# Altium PCB Smart Meter V1.0.PcbDoc (part 1 of 4)
Units mil, origin at the board's own origin, x right, y up, seen from the top; angles counter-clockwise.
Board outline 5111 x 3011 mil, 2 copper layers (Top Layer, Bottom Layer); 181 components, 132 nets, 643 pads, 0 vias.
Unrouted connection lines stored in the file: 416.
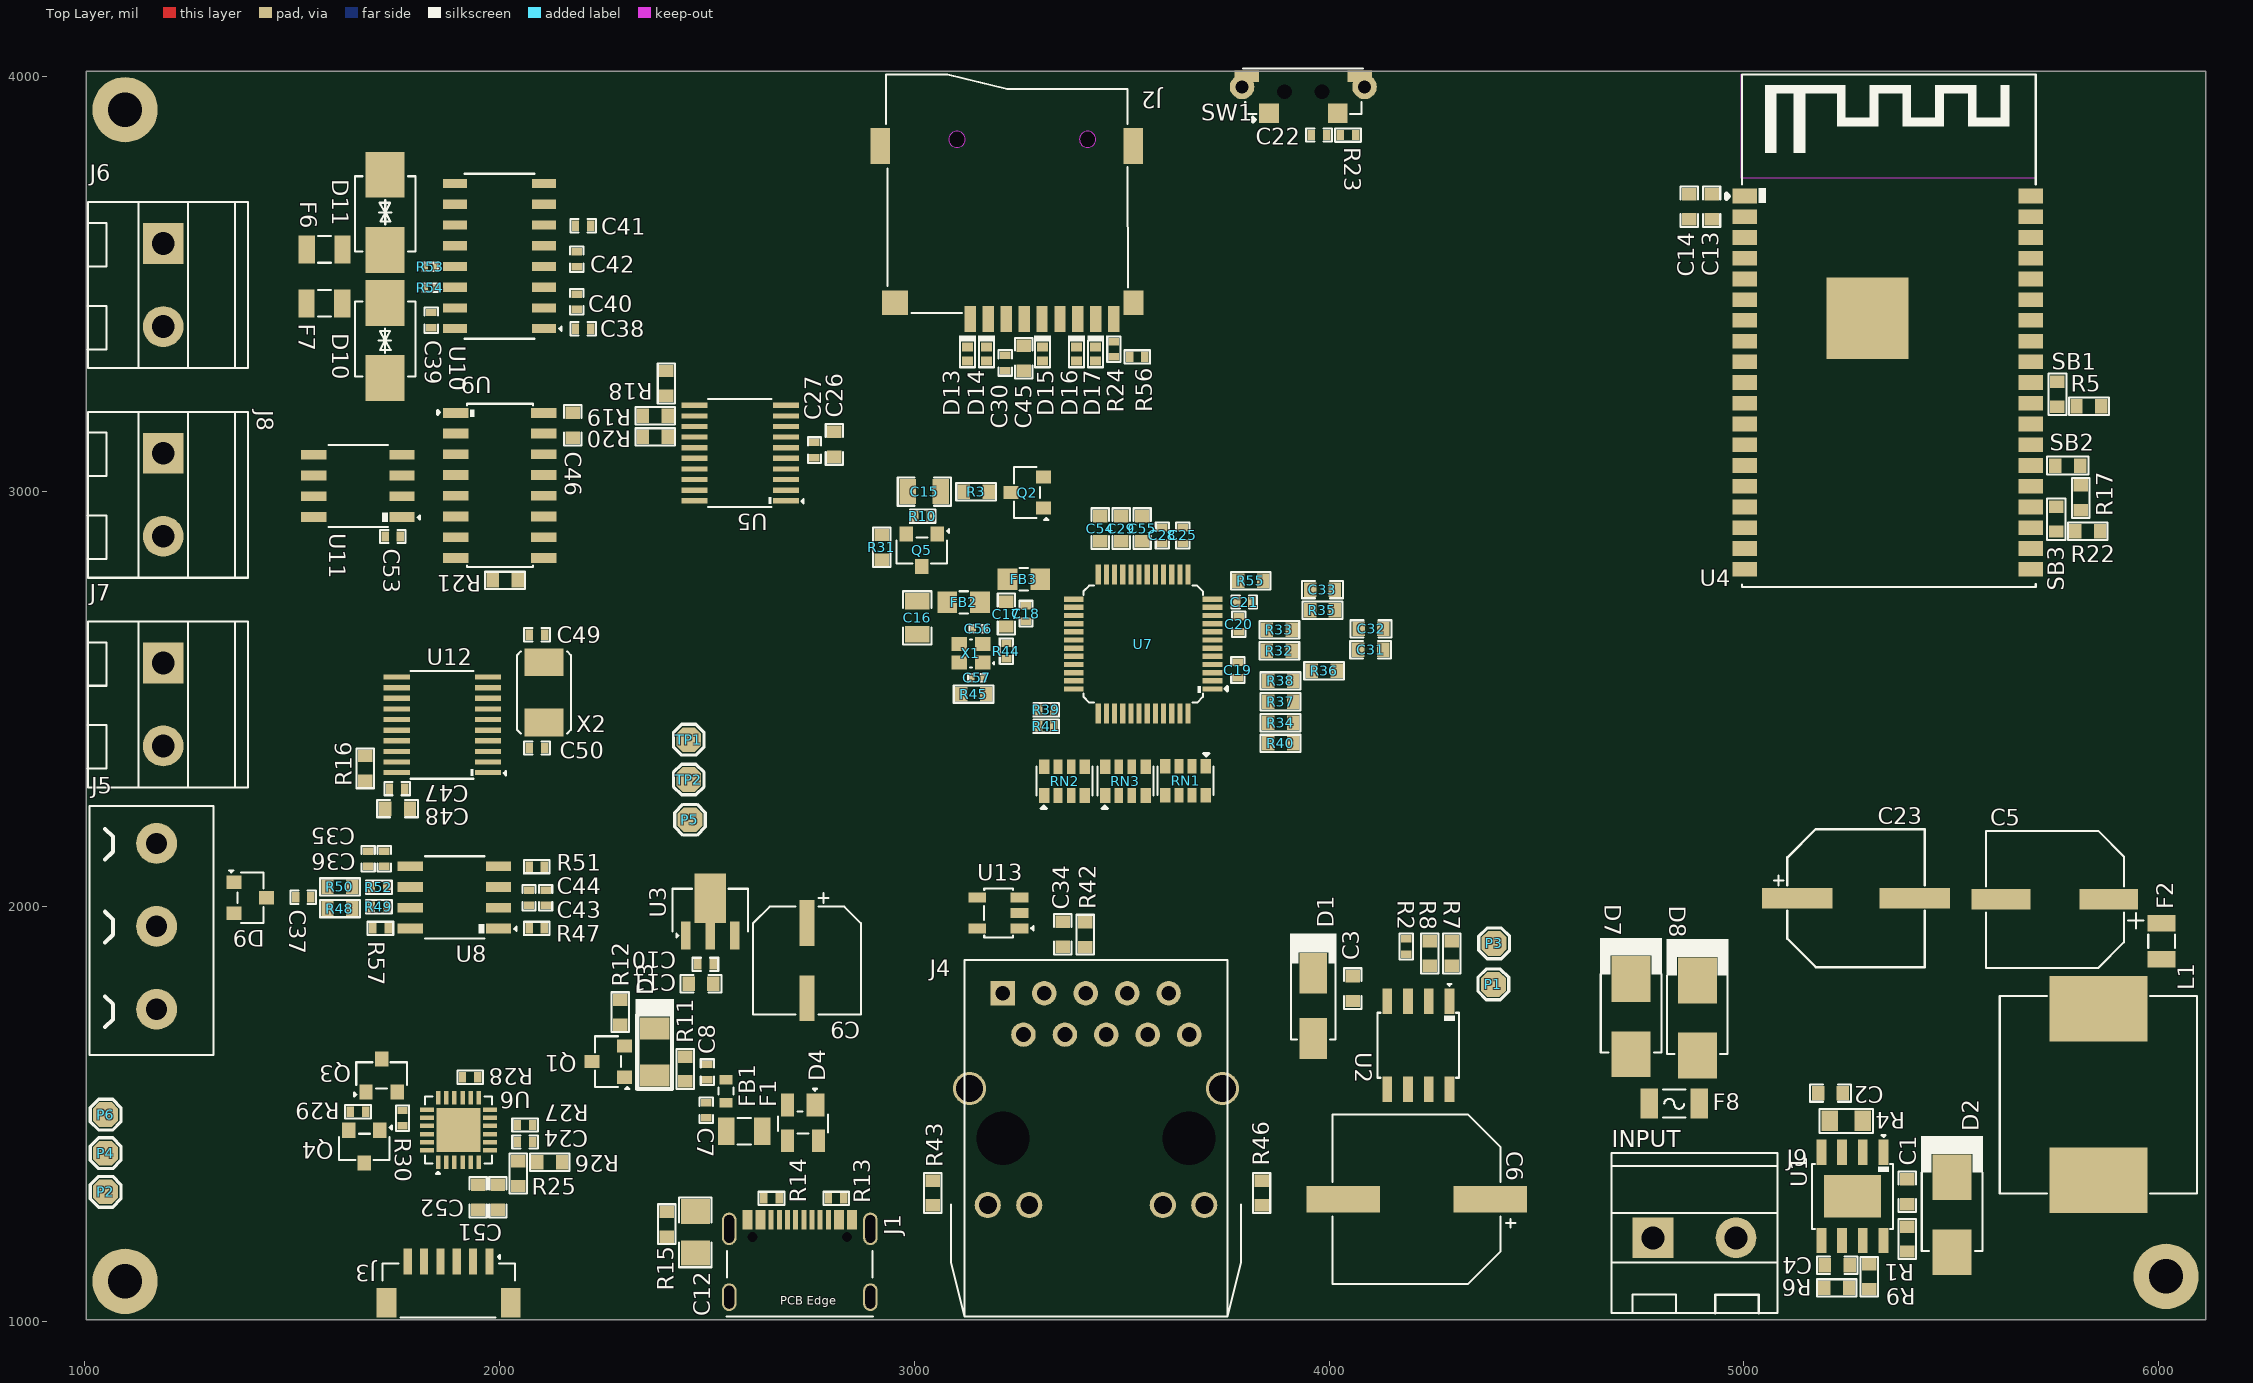
[diagram p0: Top Layer view]
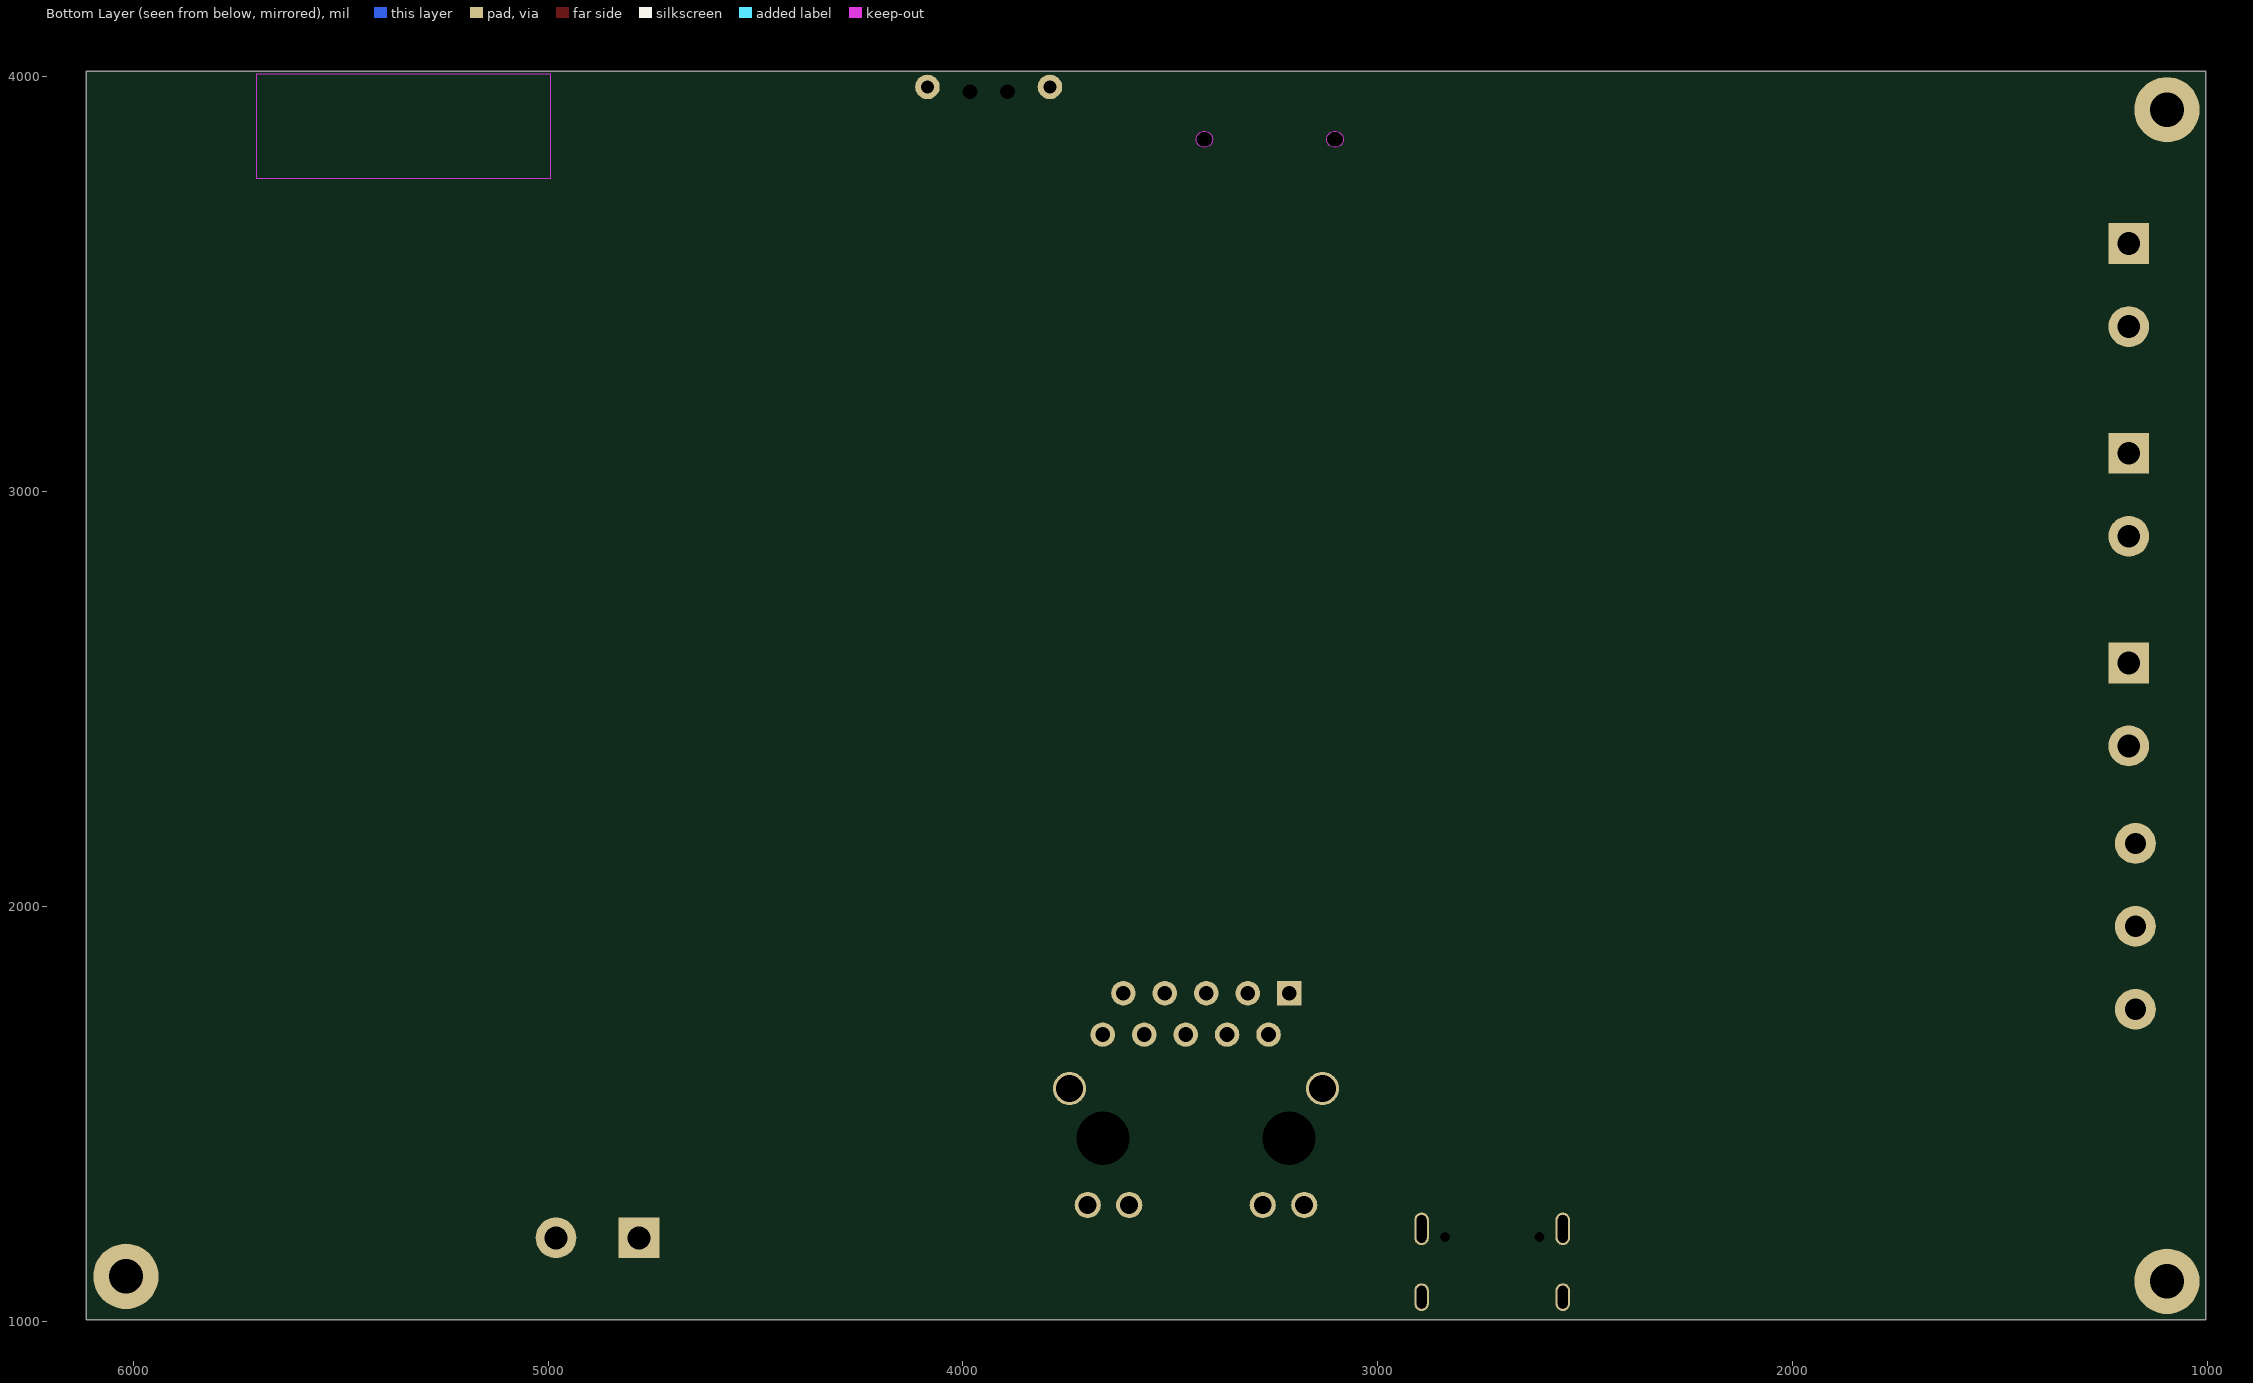
[diagram p1: Bottom Layer view, seen from below]

## Layer stack, top to bottom
Top Solder: solder mask 0.4, Solder Resist, Dk 3.5
Top Layer: signal copper 1.4
Dielectric 1: dielectric 12.6, FR-4, Dk 4.8
Bottom Layer: signal copper 1.4
Bottom Solder: solder mask 0.4, Solder Resist, Dk 3.5

## Board outline
1003,1003 1003,4014 6114,4014 6114,1003

## Design rules (kind name [scope] priority, off if disabled: settings)
Clearance [All] p1: gap=10 ignorepadtopadclearanceinfootprint=FALSE except(0: Arc-Hole Track-Hole SMDPad-Hole THPad-Hole Via-Hole Fill-Hole Poly-Hole Region-Hole Text-Hole)
DiffPairsRouting [All] p1: maxlimit=10 minlimit=10 mostfreqgap=10 toplayer_minwidth=15 toplayer_maxwidth=15 toplayer_prefwidth=15 bottomlayer_minwidth=15 bottomlayer_maxwidth=15 bottomlayer_prefwidth=15 maxuncoupledlength=500
MatchedLengths "Schematic Matched Net Lengths_1" [InNetClass('Ethernet')] p1: tolerance=20 checknetsindiffpair=FALSE checkdiffpairvsdiffpair=TRUE checkxsignals=TRUE checkothers=TRUE
MatchedLengths "Schematic Matched Net Lengths" [InNetClass('USB')] p2: tolerance=50 checknetsindiffpair=TRUE checkdiffpairvsdiffpair=FALSE checkxsignals=FALSE checkothers=FALSE
MatchedLengths "Schematic Matched Net Lengths_2" [InNetClass('USB')] p3: tolerance=20 checknetsindiffpair=TRUE checkdiffpairvsdiffpair=FALSE checkxsignals=FALSE checkothers=FALSE
MaxMinImpedance "Schematic Impedance Constraint_1" [InNetClass('Ethernet')] p1: minimum=97.00 maximum=105.0
MaxMinImpedance "Schematic Impedance Constraint" [InNetClass('USB')] p2: minimum=85.00 maximum=90.00
MaxMinImpedance "Schematic Impedance Constraint_3" [InNetClass('USB')] p3: minimum=87.00 maximum=92.00
MaxMinImpedance "Schematic Impedance Constraint_2" [InNetClass('CAN')] p4: minimum=117.0 maximum=123.0
PolygonConnect [All] p1: connectstyle=Relief reliefconductorwidth=10 reliefentries=4 polygonreliefangle="90 Angle" airgapwidth=10
RoutingVias [All] p1: holewidth=28 width=50 viastyle="Through Hole" minholewidth=28 minwidth=50 maxholewidth=28 maxwidth=50
SolderMaskExpansion [All] p1: expansion=4 istentingtop=FALSE
Width [All] p1: maxlimit=10 minlimit=10 preferedwidth=10
29 further rules are at their usual default settings.

## Classes and differential pairs
differential pair class USB_Lines: USB_D
differential pair class Ethernet_Lines: RD TD
differential pair class CAN: CAN
differential pair class CAN_Lines: CAN
net class USB: USB_D_N USB_D_P
net class Ethernet: RD_N RD_P TD_N TD_P
net class CAN: CAN_N CAN_P
component class "SD Card-Sheet": C30 C45 D13 D14 D15 D16 D17 J2 J10 R24 R55 R56
component class "RS232, RS485 and RS422": C38 C39 C40 C41 C42 C53 D10 D11 F6 F7 R53 R54 U10 U11
component class "Power Sheet1": C1 C2 C3 C4 C5 C6 C7 C8 C9 C10 C11 C12 C23 D1 D2 D3 D4 D7 D8 F1 F2 FB1 J1 L1 P1 P2 P3 P4 P5 P6 Q1 R1 R2 R4 R6 R7 R8 R9 R11 R12 R13 R14 R15 U1 U2 U3
component class "Ethernet Sheet": C15 C16 C17 C18 C19 C20 C21 C25 C28 C29 C31 C32 C33 C34 C54 C55 C56 C57 FB2 FB3 J4 Q2 Q5 R3 R10 R31 R32 R33 R34 R35 R36 R37 R38 R39 R40 R41 R42 R43 R44 R45 R46 R55 RN1 RN2 RN3 U7 U13 X1
component class "Controller Sheet": C13 C14 C22 C24 C26 C27 C46 C51 C52 J3 Q3 Q4 R5 R17 R18 R19 R20 R21 R22 R23 R25 R26 R27 R28 R29 R30 SB1 SB2 SB3 SW1 U4 U5 U6 U9
component class Connector_Sheet: F8 J5 J6 J7 J8 J9
component class Can_Sheet: C35 C36 C37 C43 C44 C47 C48 C49 C50 D9 R16 R47 R48 R49 R50 R51 R52 R57 TP1 TP2 U8 U12 X2
differential pair USB_D: +USB_D_P -USB_D_N
differential pair TD: +TD_P -TD_N
differential pair RD: +RD_P -RD_N
differential pair CAN: +CAN_P -CAN_N

## Components (designator, comment, footprint, x,y, rotation, side; value= is the part's Value field where it differs from the comment)
C1 "0.1uF" Cap-0603 5393.84,1312 r270 top
C2 "0.1uF" Cap-0603 5208.84,1550 r180 top
C3 "0.1uF" Cap-0603 4057,1802 r90 top
C4 "12pF" Cap-0603 5225,1135.16 r0 top
C5 "470uF" VZH471M1CTR-0810 5750,2017 r180 top
C6 "15uF" UD2C150M1010 4210.83,1294 r180 top
C7 "0.1uF" Cap-0402 2498,1508.5 r90 top
C8 "0.1uF" Cap-0402 2501,1600.5 r270 top
C9 "100uF" UCD1A101MCL1GS 2741,1869.45 r270 top
C10 "0.1uF" Cap-0402 2496.13,1860.3 r0 top
C11 "10uF" Cap-0603 2485.63,1813.3 r180 top
C12 "4.7nF" Cap-1206 2472,1214 r270 top
C13 "0.1uF" CAP-0603 4922,3687 r270 top
C14 "22uF" Cap-0603 4868,3687 r270 top
C15 "22uF" Cap-0805 3024,3000 r180 top
C16 "22uF" Cap-0805 3007,2696 r90 top
C17 "10uF" Cap-0603 3222,2705 r90 top
C18 "0.1uF" Cap-0402 3269,2706 r90 top
C19 "0.1uF" Cap-0402 3780,2570 r90 top
C20 "0.1uF" Cap-0402 3782,2680.5 r270 top
C21 "0.1uF" Cap-0402 3795.5,2734 r180 top
C22 "1uF" Cap-0402 3975.5,3860 r0 top
C23 "100uF" VKMD1451K101MV 5128.8,2020 r0 top
C24 "1uF" Cap-0402 2061.5,1432 r0 top
C25 "0.1uF" Cap-0402 3647,2894.5 r270 top
C26 "0.1uF" CAP-0603 2807.3,3114 r90 top
C27 "1uF" Cap-0402 2759.06,3100.2 r90 top
C28 "0.1uF" Cap-0402 3598,2894.5 r270 top
C29 "10uF" Cap-0603 3498.5,2911 r270 top
C30 "0.1uF" Cap-0402 3219,3310.5 r90 top
C31 "6.8nF" Cap-0603 4100,2619 r180 top
C32 "6.8nF" Cap-0603 4101,2669 r180 top
C33 "10nF" Cap-0603 3984,2764 r0 top
C34 "22nF" Cap-0603 3358,1933 r90 top
C35 "4.7uF" Cap-0402 1722,2115 r270 top
C36 "0.1uF" Cap-0402 1683,2115 r270 top
C37 "4.7nF" Cap-0402 1526.5,2022 r180 top
C38 "0.1uf" Cap-0402 2201.5,3393 r0 top
C39 "0.1uf" Cap-0402 1835,3413.5 r270 top
C40 "0.1uf" Cap-0402 2186,3458 r270 top
C41 "0.1uf" Cap-0402 2201.5,3641 r180 top
C42 "0.1uf" Cap-0402 2186,3560.5 r90 top
C43 "0.1uF" Cap-0402 2111,2021 r90 top
C44 "4.7uF" Cap-0402 2071,2021 r90 top
C45 "10uF" Cap-0603 3264,3322 r270 top
C46 "0.1uF" CAP-0603 2176.3,3160 r270 top
C47 "0.1uF" Cap-0402 1753,2284 r0 top
C48 "10uF" Cap-0603 1754,2236 r180 top
C49 "22PF" Cap-0402 2090,2655 r0 top value=22pF
C50 "22PF" Cap-0402 2090,2382 r0 top value=22pF
C51 "4.7uF" Cap-0603 1996,1299 r270 top
C52 "100nF" Cap-0603 1948,1299 r270 top
C53 "0.1uf" Cap-0402 1742.5,2892 r0 top
C54 "10nF" Cap-0603 3448,2911 r270 top
C55 "4.7uF" Cap-0603 3549,2911 r270 top
C56 "12pF" CAP-0201 3154,2669 r0 top
C57 "12pF" CAP-0201 3151,2551 r180 top
D1 "SMAJ58A" SMA 3962,1760 r270 top
D2 "SS510B" SMB_ 5501.84,1256.45 r90 top
D3 "PMEG4030ER" SOD-123FL 2374,1649 r270 top
D4 "SP0503BAHTG" SOT-143-4_ 2761.13,1521.61 r270 top
D7 "SS510B" SMB_ 4728,1734.45 r90 top
D8 "SS510B" SMB_ 4888,1731 r90 top
D9 "CDSOT23-T24CAN-Q" SOT-23 1399,2021 r270 top
D10 "SMBJ26CA" "SMB Bi Directional" 1724,3364.45 r90 top
D11 "SMBJ26CA" "SMB Bi Directional" 1724,3673.45 r270 top
D13 "ESD5451N-2/TR" DFN1006-2L_ 3128,3331.99 r270 top
D14 "ESD5451N-2/TR" DFN1006-2L_ 3174,3332 r270 top
D15 "ESD5451N-2/TR" DFN1006-2L_ 3309,3332 r270 top
D16 "ESD5451N-2/TR" DFN1006-2L_ 3391,3332 r270 top
D17 "ESD5451N-2/TR" DFN1006-2L_ 3437,3332 r270 top
F1 "BSMD0805L-200" Fuse-0805 2590,1458 r180 top
F2 "BSMD0805L-200" Fuse-0805 6007,1916 r90 top
F6 "SMD0805P020TF" Fuse-0805 1578,3584 r0 top
F7 "SMD0805P020TF" Fuse-0805 1577.69,3454 r0 top
F8 "JFC1206-1100FS" "Fuse 1206 (3216 Metric)" 4832,1525 r0 top
FB1 "BLM18SG121TN1D" "IND-0603 (1608 Metric)" 2546,1554.44 r90 top
FB2 "CBM201209U601T" Ind-0805 3119,2733 r0 top
FB3 "CBM201209U601T" Ind-0805 3264,2789 r180 top
J1 "TYPE-C-31-M-12" TYPE-C-31-M-12_ 2723.72,1151.5 r0 top
J2 "TF-01A" TF-01A 3223,3625 r180 top
J3 "Voltlink Target" "Voltlink Target" 1877,1094 r180 top
J4 "HY931147C" HY931147C 3438,1535.5 r0 top
J5 "WJ500V-5.08-3P" WJ500V-5.08-3P 1173,2152 r270 top
J6 "1715721" 1715721 1189,3498 r270 top
J7 "1715721" 1715721 1189,2487 r270 top
J8 "1715721" 1715721 1189,2992.5 r270 top
J9 "1715721" 1715721 4881,1201 r0 top
L1 "33uH" CYH127-33UH 5855,1546.31 r90 top
P1 "TEST POINT" Test-point 4396,1812 r270 top
P2 "TEST POINT" Test-point 1050,1312 r270 top
P3 "TEST POINT" Test-point 4398,1911 r270 top
P4 "TEST POINT" Test-point 1050,1405 r0 top
P5 "TEST POINT" Test-point 2459,2209 r0 top
P6 "TEST POINT" Test-point 1050,1498 r270 top
Q1 "SI2323DS" SOT-23 2262,1626 r90 top
Q2 "LMUN2211LT1G" SOT-23 3272,2998 r90 top
Q3 "SS8050-G" SOT-23 1715.4,1592.37 r0 top
Q4 "SS8050-G" SOT-23 1674,1421 r180 top
Q5 "WPM2015-3/TR" Sot-23 3018,2859 r180 top
R1 "4.7R" Res-0603 5393.84,1198 r270 top
R2 "24.9K" Res-0402 4186,1903.5 r90 top
R3 "1K" Res-0603 3149,3000 r0 top
R4 "30mR" RES-0805 5246.84,1483 r180 top
R5 "10K" Res-0603 5832,3206 r0 top value=10kR
R6 "300K" Res-0603 5224,1080.16 r0 top
R7 "180K" Res-0603 4296,1886.5 r270 top value=180kR
R8 "4.42K" Res-0603 4243,1886.5 r270 top value=4.42kR
R9 "57.6K" Res-0603 5302,1107.16 r270 top
R10 "10K" Res-0402 3020,2941 r0 top
R11 "100K" Res-0603 2448,1608 r270 top
R12 "100K" Res-0603 2291,1745 r270 top
R13 "5.1K" Res-0402 2811.5,1296 r180 top
R14 "5.1K" Res-0402 2655.5,1296 r0 top
R15 "1M" Res-0603 2403,1234 r270 top
R16 "10K" Res-0603 1676,2333 r270 top value=10kR
R17 "4.7K" Res-0603 5812,2985 r90 top
R18 "4.7K" Res-0603 2402.3,3261 r270 top
R19 "4.7K" Res-0603 2375.3,3183 r0 top
R20 "4.7K" Res-0603 2375.3,3132 r0 top
R21 "4.7K" Res-0603 2013.3,2786 r0 top
R22 "4.7K" Res-0603 5829,2905 r180 top
R23 "10K" Res-0402 4045.5,3860 r0 top
R24 "22" Res-0402 3481,3343.5 r270 top
R25 "22.1K" Res-0603 2045,1356 r90 top
R26 "47.5K" Res-0603 2121,1383 r180 top
R27 "1K" Res-0402 2061.5,1473 r180 top
R28 "10K" Res-0402 1929,1588 r180 top
R29 "10K" Res-0402 1658.5,1505 r180 top
R30 "10K" Res-0402 1766,1489.5 r90 top
R31 "DNP" Res-0603 2921,2866 r270 top
R32 "33R" Res-0603 3880,2616.8 r180 top
R33 "33R" Res-0603 3880,2667 r180 top
R34 "33R" Res-0603 3883,2443.2 r180 top
R35 "49.9R" Res-0603 3984,2714 r180 top
R36 "49.9R" Res-0603 3988,2568 r180 top
R37 "33R" Res-0603 3883,2493.4 r180 top
R38 "49.9R" Res-0603 3883,2543.6 r180 top
R39 "10K" Res-0402 3318,2474 r0 top
R40 "49.9R" Res-0603 3883,2393 r180 top
R41 "10K" Res-0402 3318,2435 r0 top
R42 "10R" Res-0603 3412,1932 r90 top
R43 "330R" Res-0603 3044,1309 r90 top
R44 "1M" Res-0402 3222,2615.5 r270 top
R45 "0R" Res-0603 3143,2512 r0 top
R46 "330R" Res-0603 3837,1309 r90 top
R47 "22R" Res-0402 2089.5,1947 r0 top
R48 "60.4R" Res-0603 1615,1995 r180 top
R49 "0R" Res-0402 1709,1999 r180 top
R50 "60.4R" Res-0603 1615,2047 r0 top
R51 "22R" Res-0402 2089.5,2096 r0 top
R52 "0R" Res-0402 1709,2046 r180 top
R53 "22R" Res-0201 1833,3542 r0 top
R54 "22R" Res-0201 1833,3492 r0 top
R55 "12.4K" Res-0603 3811,2785 r180 top
R56 "100K" Res-0402 3537.5,3325 r0 top
R57 "4.7K" Res-0402 1712.5,1947 r0 top
RN1 "10K" YC164-FR-0710KL 3702.64,2337.68 r270 top value=10kR
RN2 "10K" YC164-FR-0710KL 3313.43,2267.32 r90 top value=10kR
RN3 "10K" YC164-FR-0710KL 3459.93,2267.32 r90 top value=10kR
SB1 "Solder Bridge 0603" "Solder Bridge" 5756,3235 r270 top
SB2 "Solder Bridge 0603" "Solder Bridge" 5781,3063 r0 top
SB3 "Solder Bridge 0603" "Solder Bridge" 5753,2934 r270 top
SW1 "YTS-B003-2A" YTS-B003-2A 3937.72,3957.11 r0 top
TP1 "TEST POINT" Test-point 2456,2402 r0 top
TP2 "TEST POINT" Test-point 2456,2306 r90 top
U1 "TX4138" 8-SOIC-EP 5261.84,1301 r270 top
U2 "TPS2375DR" SOIC-8 4215,1665.3 r270 top
U3 "LR1107G-33-AB3-C-R" SOT-89-3 2508.06,1974.59 r0 top
U4 "ESP32-WROVER-E-N8R8" ESP32-WROVER-E-N8R8 5347,3263 r0 top
U5 "PCF8574APWR" TSSOP-20 2580.06,3093.2 r180 top
U6 "CP2102N-A02-GQFN24R" "24-WQFN (4x4)" 1901,1461 r90 top
U7 "W5500" "48-LQFP (7x7)_" 3551.68,2632.53 r180 top
U8 "TCAN1044VDRQ1" "SOIC-8(0.154\", 3.90mm Width)" 1891,2022 r180 top
U9 "TPW4053-SR" SOIC-16 2000.3,3015 r0 top
U10 "MAX3232ESE" SOP-16 1999.73,3568 r180 top
U11 "MAX3490EESA+T" "SOIC-8(0.154\", 3.90mm Width)" 1658.3,3014 r180 top
U12 "MCP2515T-I/ST" TSSOP-20 1862.24,2437.8 r180 top
U13 "SP0504BAHTG" SOT-23-5 3202.82,1984.4 r180 top value=30pF
X1 "25MHz" Q22FA12800090 3165,2587.72 r180 top
X2 "8MHz" SMD5032-2P 2107,2516 r90 top

## Footprints (in the part's own frame and the unit in brackets; to place one, negate y for a bottom-side part, rotate by r counter-clockwise, add the part's x,y. Pads: shape width x height; smd on the part's side, far side on the other; paste and mask are expansions set on the pad)
8-SOIC-EP [mm]
  rect 1.55x0.6 smd: 1(-2.7,1.905) 2(-2.7,0.635) 3(-2.7,-0.635) 4(-2.7,-1.905) 5(2.7,-1.905) 6(2.7,-0.635) 7(2.7,0.635) 8(2.7,1.905)
  rect 2.613x3.502 smd: 9(0,0)
  silkscreen extent -3.76,-2.49 1.99,2.49, body extent -3,-2.45 3,2.45, height 1.7
"24-WQFN (4x4)" [mm]
  rect 0.85x0.28 smd: 1(-1.975,1.25) 2(-1.975,0.75) 3(-1.975,0.25) 4(-1.975,-0.25) 5(-1.975,-0.75) 6(-1.975,-1.25) 13(1.975,-1.25) 14(1.975,-0.75) 15(1.975,-0.25) 16(1.975,0.25) 17(1.975,0.75) 18(1.975,1.25)
  rect 0.28x0.85 smd: 7(-1.25,-1.925) 8(-0.75,-1.925) 9(-0.25,-1.925) 10(0.25,-1.925) 11(0.75,-1.925) 12(1.25,-1.925) 19(1.25,1.925) 20(0.75,1.925) 21(0.25,1.925) 22(-0.25,1.925) 23(-0.75,1.925) 24(-1.25,1.925)
  rect 2.7x2.7 smd: 25(0,0)
  silkscreen extent -2.69,-2.06 2.06,2.06, body extent -2,-2 2,2, height 0.8
"48-LQFP (7x7)_" [mm]
  rect 1.22x0.32 smd: 1(-4.25,2.75) 2(-4.25,2.25) 3(-4.25,1.75) 4(-4.25,1.25) 5(-4.25,0.75) 6(-4.25,0.25) 7(-4.25,-0.25) 8(-4.25,-0.75) 9(-4.25,-1.25) 10(-4.25,-1.75) 11(-4.25,-2.25) 12(-4.25,-2.75) 25(4.25,-2.75) 26(4.25,-2.25) 27(4.25,-1.75) 28(4.25,-1.25) 29(4.25,-0.75) 30(4.25,-0.25) 31(4.25,0.25) 32(4.25,0.75) 33(4.25,1.25) 34(4.25,1.75) 35(4.25,2.25) 36(4.25,2.75)
  rect 0.32x1.22 smd: 13(-2.75,-4.25) 14(-2.25,-4.25) 15(-1.75,-4.25) 16(-1.25,-4.25) 17(-0.75,-4.25) 18(-0.25,-4.25) 19(0.25,-4.25) 20(0.75,-4.25) 21(1.25,-4.25) 22(1.75,-4.25) 23(2.25,-4.25) 24(2.75,-4.25) 37(2.75,4.25) 38(2.25,4.25) 39(1.75,4.25) 40(1.25,4.25) 41(0.75,4.25) 42(0.25,4.25) 43(-0.25,4.25) 44(-0.75,4.25) 45(-1.25,4.25) 46(-1.75,4.25) 47(-2.25,4.25) 48(-2.75,4.25)
  silkscreen extent -5.16,-3.58 3.66,3.58, body extent -4.51,-4.51 4.49,4.49, height 1.43
1715721 [mm]
  rect 2.5x2.5 hole 1.4 paste+0 mask+0.051: 1(-2.54,0)
  round 2.5 hole 1.4 paste+0 mask+0.051: 2(2.54,0)
  silkscreen extent -5.08,-4.62 5.08,5.18, body extent -5.64,-4.62 5.09,5.21, height 14.2
CAP-0201 [mm]
  rect 0.3x0.3 smd mask+0.055: 1(-0.3,0) 2(0.3,0)
  silkscreen extent -0.53,-0.23 0.53,0.23, body extent -0.3,-0.15 0.3,0.15, height 0.28
Cap-0402 [mil]
  rect 18x25 smd mask+2.36: 1(-18.5,0) 2(18.5,0)
  silkscreen extent -31,-16 31,16, body extent -20,-10 20,10, height 19
Cap-0603 [mil]
  rect 30x35 smd mask+2.36: 1(-30,0) 2(30,0)
  silkscreen extent -49,-21 49,21, body extent -32,-16 31,16, height 34
CAP-0603 [mil]
  rect 30x35 smd mask+2.36: 1(-30,0) 2(30,0)
  silkscreen extent -49,-21 49,21, body extent -32,-16 31,16, height 34
Cap-0805 [mil] "SMD 0805"
  rect 40x60 smd mask+2.76: 1(-40,0) 2(40,0)
  silkscreen extent -64,-34 64,34, body extent -39,-25 39,25, height 30
Cap-1206 [mil] "SMD 1206"
  rect 60x70 smd: 1(-50,0) 2(50,0)
  silkscreen extent -84,-39 84,39, body extent -63,-31 63,32, height 39
CYH127-33UH [mm]
  rect 4x6 smd mask+0.055: 1(-5.25,0) 2(5.25,0)
  silkscreen extent -6.05,-6.05 6.05,6.05, body extent -6,-6 6,6, height 7.98
DFN1006-2L_ [mm]
  rect 0.55x0.66 smd: 1(-0.425,0) 2(0.425,0)
  silkscreen extent -1.14,-0.51 0.81,0.51, body extent -0.5,-0.3 0.5,0.3, height 0.47
ESP32-WROVER-E-N8R8 [mm]
  rect 1.5x0.9 smd: 1(-8.75,11.43) 2(-8.75,10.16) 3(-8.75,8.89) 4(-8.75,7.62) 5(-8.75,6.35) 6(-8.75,5.08) 7(-8.75,3.81) 8(-8.75,2.54) 9(-8.75,1.27) 10(-8.75,0) 11(-8.75,-1.27) 12(-8.75,-2.54) 13(-8.75,-3.81) 14(-8.75,-5.08) 15(-8.75,-6.35) 16(-8.75,-7.62) 17(-8.75,-8.89) 18(-8.75,-10.16) 19(-8.75,-11.43) 20(8.75,-11.43) 21(8.75,-10.16) 22(8.75,-8.89) 23(8.75,-7.62) 24(8.75,-6.35) 25(8.75,-5.08) 26(8.75,-3.81) 27(8.75,-2.54) 28(8.75,-1.27) 29(8.75,0) 30(8.75,1.27) 31(8.75,2.54) 32(8.75,3.81) 33(8.75,5.08) 34(8.75,6.35) 35(8.75,7.62) 36(8.75,8.89) 37(8.75,10.16) 38(8.75,11.43)
  rect 5x5 smd: 39(-1.241,3.945)
  Keep-Out Layer region: 9.06,12.501 -8.97,12.501 -8.97,18.87 9.06,18.87
  silkscreen extent -9.88,-12.53 9.06,18.87, body extent -8.95,-12.52 9.05,18.87, height 3.65
"Fuse 1206 (3216 Metric)" [mm] "0.126\" L x 0.062\" W x 0.026\" H (3.20mm x 1.58mm x 0.65mm)"
  rect 1.06x1.82 smd: 1(-1.528,0) 2(1.528,0)
  silkscreen extent -0.68,-0.85 0.68,0.85, body extent -1.6,-0.79 1.6,0.79, height 0.85
Fuse-0805 [mm]
  rect 1x1.7 smd: 1(-1.1,0) 2(1.1,0)
  silkscreen extent -0.41,-0.81 0.41,0.81, body extent -1.1,-0.75 1.1,0.75, height 1.24
HY931147C [mm]
  rect 1.5x1.5 hole 0.9 paste+0 mask+0.051: 1(-5.715,6.49)
  round 1.5 hole 0.9 paste+0 mask+0.051: 2(-4.445,3.95) 3(-3.175,6.49) 4(-1.905,3.95) 5(-0.635,6.49) 6(0.635,3.95) 7(1.905,6.49) 8(3.175,3.95) 9(4.445,6.49) 10(5.715,3.95)
  round 1.6 hole 1.1 paste+0 mask+0.051: 11(-6.629,-6.49) 12(-4.089,-6.49) 13(4.089,-6.49) 14(6.629,-6.49)
  round 2.029 hole 1.631 paste+0 mask+0.051: GND1(-7.747,0.648) GND2(7.747,0.648)
  round 0 hole 3.25 unplated paste+0 mask+0.051: MH(-5.7,-2.4) MH(5.7,-2.4)
  silkscreen extent -8.89,-13.32 8.89,8.52, body extent -9.2,-13.3 9.2,8.31, height 15.2
"IND-0603 (1608 Metric)" [mm] "0.063\" L x 0.032\" W (1.60mm x 0.80mm)"
  rect 0.6x0.8 smd: 1(-0.7,0) 2(0.7,0)
  silkscreen extent -0.2,-0.46 0.23,0.46, body extent -0.8,-0.4 0.8,0.4, height 0.78
Ind-0805 [mm] "Inductor 0805"
  rect 1.2x1.32 smd: 1(-1,0) 2(1,0)
  silkscreen extent -0.25,-0.69 0.25,0.69, body extent -1,-0.62 1,0.63, height 0.47
Q22FA12800090 [mm]
  rect 0.95x0.85 smd: 1(0,-1.15) 2(1.45,-1.15) 3(1.45,0) 4(0,0)
  silkscreen extent -0.7,-1.41 0.78,0.29, body extent -0.3,-1.36 1.7,0.24, height 0.65
Res-0201 [mm]
  rect 0.27x0.37 smd mask+0.055: 1(-0.275,0) 2(0.275,0)
  silkscreen extent -0.48,-0.25 0.48,0.25, body extent -0.3,-0.15 0.3,0.15, height 0.29
Res-0402 [mil]
  rect 18x25 smd mask+2.17: 1(-18.5,0) 2(18.5,0)
  silkscreen extent -32,-17 32,16, body extent -23,-11 23,11, height 16
Res-0603 [mil]
  rect 30x35 smd: 1(-30,0) 2(30,0)
  silkscreen extent -48,-21 48,21, body extent -31,-17 31,17, height 18
RES-0805 [mil] "SMD 0805"
  rect 40x50 smd: 1(-40,0) 2(40,0)
  silkscreen extent -64,-29 64,29, body extent -39,-25 39,24, height 24
SMA [mm]
  rect 2.5x1.7 smd: 1(-2,0) 2(2,0)
  silkscreen extent -4.45,-1.42 2.06,1.42, body extent -2.6,-1.3 2.6,1.3, height 2.4
"SMB Bi Directional" [mm]
  rect 2.8x2.4 smd: 1(-2.3,0) 2(2.3,0)
  silkscreen extent -2.21,-1.85 2.39,1.85, body extent -2.7,-1.8 2.7,1.8, height 2.3
SMB_ [mm]
  rect 2.8x2.4 smd: 1(-2.3,0) 2(2.3,0)
  silkscreen extent -2.21,-1.91 4.83,1.9, body extent -2.7,-1.8 2.7,1.8, height 2.3
SMD5032-2P [mm]
  rect 1.7x2.4 smd: 1(-1.85,0) 2(1.85,0)
  silkscreen extent -2.51,-1.65 2.51,1.65, body extent -2.5,-1.6 2.5,1.6, height 1.3
SOD-123FL [mm]
  rect 1.34x1.8 smd: 1(-1.43,0) 2(1.43,0)
  silkscreen extent -3.25,-1.17 2.26,1.17, body extent -1.8,-0.82 1.8,0.82, height 0.95
SOIC-8 [mm]
  rect 1.55x0.6 smd: 1(-2.7,1.905) 2(-2.7,0.635) 3(-2.7,-0.635) 4(-2.7,-1.905) 5(2.7,-1.905) 6(2.7,-0.635) 7(2.7,0.635) 8(2.7,1.905)
  silkscreen extent -3.76,-2.49 1.99,2.49, body extent -3,-2.45 3,2.45, height 1.7
"SOIC-8(0.154\", 3.90mm Width)" [mm]
  rect 1.55x0.6 smd: 1(-2.7,1.905) 2(-2.7,0.635) 3(-2.7,-0.635) 4(-2.7,-1.905) 5(2.7,-1.905) 6(2.7,-0.635) 7(2.7,0.635) 8(2.7,1.905)
  silkscreen extent -3.79,-2.51 1.8,2.51, body extent -3.01,-2.45 3.01,2.45, height 1.63
SOIC-16 [mm]
  rect 1.55x0.6 smd: 1(-2.7,4.445) 2(-2.7,3.175) 3(-2.7,1.905) 4(-2.7,0.635) 5(-2.7,-0.635) 6(-2.7,-1.905) 7(-2.7,-3.175) 8(-2.7,-4.445) 9(2.7,-4.445) 10(2.7,-3.175) 11(2.7,-1.905) 12(2.7,-0.635) 13(2.7,0.635) 14(2.7,1.905) 15(2.7,3.175) 16(2.7,4.445)
  silkscreen extent -3.82,-5 2.03,5, body extent -3,-4.95 3,4.95, height 1.75
"Solder Bridge" [mil] "Solder Bridge ON"
  rect 30x35 smd: 1(-30,0) 2(30,0)
  silkscreen extent -50,-22 50,22
SOP-16 [mil]
  rect 57.55x22 smd: 1(-107.27,175) 2(-107.27,125) 3(-107.27,75) 4(-107.27,25) 5(-107.27,-25) 6(-107.27,-75) 7(-107.27,-125) 8(-107.27,-175) 9(107.27,-175) 10(107.27,-125) 11(107.27,-75) 12(107.27,-25) 13(107.27,25) 14(107.27,75) 15(107.27,125) 16(107.27,175)
  silkscreen extent -149,-199 84,199, body extent -122,-197 122,197, height 69
SOT-23 [mm] "TRANS NPN 40V 0.6A SOT23"
  rect 0.82x0.92 smd: 1(-0.95,-1) 2(0.95,-1) 3(0,1)
  silkscreen extent -1.68,-1.3 1.55,0.81, body extent -1.5,-1.25 1.5,1.25, height 1.05
Sot-23 [mm] "TRANS NPN 40V 0.6A SOT23"
  rect 0.82x0.92 smd: 1(-0.95,-1) 2(0.95,-1) 3(0,1)
  silkscreen extent -1.68,-1.3 1.55,0.81, body extent -1.5,-1.25 1.5,1.25, height 1.05
SOT-23-5 [mm]
  rect 1.1x0.6 smd: 1(-1.3,0.95) 2(-1.3,0) 3(-1.3,-0.95) 4(1.3,-0.95) 5(1.3,0.95)
  silkscreen extent -2.13,-1.5 0.88,1.5, body extent -1.4,-1.45 1.4,1.45, height 1.45
SOT-89-3 [mm]
  rect 0.58x1.73 smd: 1(-1.5,-1.132) 2(0,-1.132) 3(1.5,-1.132)
  rect 1.933x3.03 smd: 2(0,1.132)
  silkscreen extent -2.31,-1.27 2.31,1.73, body extent -2.25,-1.84 2.25,2.41, height 1.54
SOT-143-4_ [mm]
  rect 1.4x1.1 smd: 1(0,0)
  rect 1.4x0.8 smd: 2(0,-1.7) 3(2.2,-1.7) 4(2.2,0.2)
  silkscreen extent -0.99,-2.27 1.76,0.77, body extent -0.08,-2.21 2.29,0.71, height 1.22
Test-point [mil]
  oct 60x60 smd: 1(0,0)
  silkscreen extent -37,-37 37,37
TF-01A [mm]
  rect 0.7x1.6 smd paste+0 mask+0.051: 1(2.245,5.3) 2(1.145,5.3) 3(0.046,5.3) 4(-1.054,5.3) 5(-2.154,5.3) 6(-3.255,5.3) 7(-4.354,5.3) 8(-5.454,5.3) 9(-6.554,5.3)
  rect 1.2x1.5 smd paste+0 mask+0.051: 10(-7.754,4.3)
  rect 1.2x2.2 smd paste+0 mask+0.051: 11(-7.746,-5.3) 12(7.754,-5.3)
  rect 1.6x1.5 smd paste+0 mask+0.051: 13(6.854,4.3)
  round 0 hole 1 unplated: MH(-4.946,-5.7) MH(3.054,-5.7)
  Keep-Out Layer board cut-out: 3.554,-5.7 3.485,-5.453 3.302,-5.272 3.054,-5.206 2.806,-5.272 2.623,-5.453 2.554,-5.7 2.554,-5.7 2.623,-5.947 2.806,-6.128 3.054,-6.194 3.302,-6.128 3.485,-5.947 3.554,-5.7
  Keep-Out Layer board cut-out: -4.446,-5.7 -4.515,-5.453 -4.698,-5.272 -4.946,-5.206 -5.194,-5.272 -5.377,-5.453 -5.446,-5.7 -5.446,-5.7 -5.377,-5.947 -5.194,-6.128 -4.946,-6.194 -4.698,-6.128 -4.515,-5.947 -4.446,-5.7
  silkscreen extent -7.41,-9.68 7.39,4.93, body extent -8.27,-9.68 8.28,5.32, height 1.95
TSSOP-20 [mm]
  rect 1.6x0.32 smd: 1(-2.8,2.925) 2(-2.8,2.275) 3(-2.8,1.625) 4(-2.8,0.975) 5(-2.8,0.325) 6(-2.8,-0.325) 7(-2.8,-0.975) 8(-2.8,-1.625) 9(-2.8,-2.275) 10(-2.8,-2.925) 11(2.8,-2.925) 12(2.8,-2.275) 13(2.8,-1.625) 14(2.8,-0.975) 15(2.8,-0.325) 16(2.8,0.325) 17(2.8,0.975) 18(2.8,1.625) 19(2.8,2.275) 20(2.8,2.925)
  silkscreen extent -3.88,-3.3 1.95,3.3, body extent -3.2,-3.25 3.2,3.25, height 1.2
TYPE-C-31-M-12_ [mm]
  rect 0.6x1.2 smd: A1/B12(-3.2,2.375) A4/B9(-2.4,2.375) B1/A12(3.2,2.375) B4/A9(2.4,2.375)
  rect 0.3x1.2 smd: A5(-1.25,2.375) A6(-0.25,2.375) A7(0.25,2.375) A8(1.25,2.375) B5(1.75,2.375) B6(0.75,2.375) B7(-0.75,2.375) B8(-1.75,2.375)
  round 0 hole 0.62 unplated: MH(-2.89,1.305) MH(2.89,1.305)
  oval 0.9x2 hole 0.6 slot 1.7 at 90 deg: S1(4.325,1.805) S4(-4.325,1.805)
  oval 0.9x1.7 hole 0.6 slot 1.4 at 90 deg: S2(4.325,-2.375) S3(-4.325,-2.375)
  silkscreen extent -4.5,-3.57 4.5,0.44, body extent -4.47,-5.01 4.47,2.89, height 3.31
UCD1A101MCL1GS [mm]
  rect 2.8x0.9 smd: 1(-2.3,0) 2(2.3,0)
  silkscreen extent -4.12,-3.3 3.3,3.3, body extent -3.5,-3.32 3.5,3.28, height 5.8
UD2C150M1010 [mm]
  rect 4.5x1.65 smd: 1(-4.5,0) 2(4.5,0)
  silkscreen extent -6.05,-5.2 5.15,5.2, body extent -5.45,-5.15 5.45,5.15, height 10.05
VKMD1451K101MV [mm]
  rect 4.3x1.26 smd paste+0 mask+0.051: 1(0,0) 2(7.193,0)
  silkscreen extent -1.43,-4.23 7.8,4.23, body extent -1.35,-4.15 8.55,4.15, height 10.25
"Voltlink Target" [mm]
  rect 0.5x1.6 smd: 1(-2.5,-1.262) 2(-1.5,-1.262) 3(-0.5,-1.262) 4(0.5,-1.262) 5(1.5,-1.262) 6(2.5,-1.262)
  rect 1.2x1.8 smd: MP1(-3.8,1.262) MP2(3.8,1.262)
  silkscreen extent -4.06,-1.68 4.06,2.17, body extent -4,-1.49 4,2.11, height 4.25
VZH471M1CTR-0810 [mm]
  rect 3.6x1.26 smd: 1(-3.3,0) 2(3.3,0)
  silkscreen extent -5.43,-4.2 4.22,4.2, body extent -4.5,-4.15 4.5,4.15, height 10.05
WJ500V-5.08-3P [mm]
  round 2.5 hole 1.3: 1(0,0) 2(5.08,0) 3(10.16,0)
  silkscreen extent -2.29,-4.11 12.95,3.49, body extent -2.22,-4.07 12.95,3.43, height 10
YC164-FR-0710KL [mm]
  rect 0.9x0.65 smd: 1(0,0) 4(0,-2.48) 5(1.77,-2.48) 8(1.77,0)
  rect 0.9x0.53 smd: 2(0,-0.84) 3(0,-1.64) 6(1.77,-1.64) 7(1.77,-0.84)
  silkscreen extent -0.79,-2.96 1.77,0.48, body extent 0.08,-2.84 1.69,0.36, height 0.7
YTS-B003-2A [mm]
  rect 1.2x1.2 smd: 1(-2.1,-1.125) 2(2.1,-1.125)
  rect 1.5x0.7 smd: 3(3.45,1.125) 4(-3.45,1.125)
  round 1.5 hole 0.8: 5(3.75,0.475) 6(-3.75,0.475)
  round 0 hole 0.9 unplated: MH0(-1.15,0.175) MH1(1.15,0.175)
  silkscreen extent -3.68,-1.68 3.66,1.6, body extent -3.7,-1.37 3.7,2.36, height 3.59

## Part data
C1 C2 C3: library part CC0603KRX7R0BB104, "CAP CER 0.1UF 100V X7R 0603", Capacitance=100nF, Case Code (Imperial)=0603, Case Code (Metric)=1608, Dielectric=X7R, LCSC Part Number=C113803, Manufacturer=Yageo, Max Operating Temperature=125°C, Min Operating Temperature=-55°C, Package Quantity=4000, Resistor Type=Ceramic, Supplier Part Number 1=311-1523-1-ND, Tolerance=10%, Voltage Rating=100V, Case/Package=0603, Category="Ceramic Capacitors", ComponentLink1Description=https://datasheet.ciiva.com/6277/mlccorderingcode-6277030.pdf?src-supplier=Digi-Key, ComponentLink1URL=https://datasheet.ciiva.com/6277/mlccorderingcode-6277030.pdf?src-supplier=Digi-Key, ComponentLink2Description=https://datasheet.ciiva.com/6277/mlccorderingcode-6277081.pdf?src-supplier=Digi-Key, ComponentLink2URL=https://datasheet.ciiva.com/6277/mlccorderingcode-6277081.pdf?src-supplier=Digi-Key, ComponentLink3Description=https://datasheet.ciiva.com/6277/mlccorderingcode-6277082.pdf?src-supplier=Digi-Key, ComponentLink3URL=https://datasheet.ciiva.com/6277/mlccorderingcode-6277082.pdf?src-supplier=Digi-Key, Depth=0.8mm, Item Type=Capacitor, Lead Free="Lead Free", Length=0.063inch, Manufacturer Part Number=CC0603KRX7R0BB104, Mount="Surface Mount", Packaging="Tape and Reel", Pricing 1="1=0.19000, 10=0.13500, 50=0.07680, 100=0.06370, 500=0.04466, 1000=0.03696 (USD)", RoHS=Yes, RoHS Compliant=Yes, Series=CC, Stock 1=60476, Supplier 1=Digi-Key, Termination=SMD/SMT, Thickness=0.035inch, Voltage Rating (DC)=100V, Weight=7.1E-05oz, Width=0.031inch
C4: library part CC0603JRNPO9BN120, "CAP CER 12PF 50V C0G/NPO 0603", Dielectric=C0G, Dielectric Material=Ceramic, Insulation Resistance=100GR, LCSC Part Number=C107034, Manufacturer=Yageo, Manufacturer Part Number=CC0603J*NPO9B*120, Supplier Part Number 1=311-1059-1-ND, Tolerance=5%, Voltage Rating (DC)=50V, Capacitance=12pF, ComponentLink1Description=http://www.kemet.com/kemet/web/homepage/kechome.nsf/file/F9080B_0402_Series_C0G/$file/F9080B_0402_Series_C0G.pdf?src-supplier=Element14, ComponentLink1URL=http://www.kemet.com/kemet/web/homepage/kechome.nsf/file/F9080B_0402_Series_C0G/$file/F9080B_0402_Series_C0G.pdf?src-supplier=Element14, ComponentLink2Description=http://www.farnell.com/datasheets/1372242.pdf?src-supplier=Element14, ComponentLink2URL=http://www.farnell.com/datasheets/1372242.pdf?src-supplier=Element14, Lead Free="Lead Free", Number of Pins=2, Packaging="Cut Tape", Pricing 1="1=0.1, 10=0.065, 100=0.0288, 500=0.0206, 1000=0.0162 (USD)", REACH SVHC="No SVHC", Stock 1=141041, Supplier 1=Digi-Key
C5: library part VZH471M1CTR-0810, "470uF 16V ±20% SMD,D8xL10mm Aluminum Electrolytic Capacitors - SMD ROHS", LCSC Part Number=C164069, Manufacturer=Lelon, Package=SMD,D8xL10mm, ComponentLink1Description=LCSC, ComponentLink1URL=https://www.lcsc.com/product-detail/Aluminum-Electrolytic-Capacitors-SMD_Lelon-VZH471M1CTR-0810_C164069.html, Item Type=Capacitor, Manufacturer Part Number=VZH471M1CTR-0810
C6: library part UD2C150M1010, "15uF 160V ±20% SMD,D10xL10.2mm Aluminum Electrolytic Capacitors - SMD ROHS", LCSC Part Number=C98557, Manufacturer="Honor Elec", Package=SMD,D10xL10.2mm, ComponentLink1Description=LCSC, ComponentLink1URL=https://www.lcsc.com/product-detail/Aluminum-Electrolytic-Capacitors-SMD_Honor-Elec-UD2C150M1010_C98557.html, Item Type=Capacitor, Manufacturer Part Number=UD2C150M1010
C7 C8 C10 C18 C19 C20 C21 C25 C28 C30 C47: library part C1005X5R1H104K050BB, "CAP CER 0.1UF 50V X5R 0402", Capacitance=100nF, Case Code (Imperial)=0402, Case Code (Metric)=1005, Dielectric=X5R, Dielectric Material=Ceramic, LCSC Part Number=C2181865, Manufacturer=TDK, Max Operating Temperature=85°C, Min Operating Temperature=-55°C, Package Quantity=1, Supplier Part Number 1=445-5942-1-ND, Tolerance=10%, Voltage=50V, Case/Package=0402, ComponentLink1Description=https://product.tdk.com/info/en/catalog/spec/mlccspec_commercial_general_midvoltage_en.pdf?src-supplier=Digi-Key, ComponentLink1URL=https://product.tdk.com/info/en/catalog/spec/mlccspec_commercial_general_midvoltage_en.pdf?src-supplier=Digi-Key, ComponentLink2Description=http://www.tdk.co.jp/tefe02/e413_c.pdf?src-supplier=Future+Electronics, ComponentLink2URL=http://www.tdk.co.jp/tefe02/e413_c.pdf?src-supplier=Future+Electronics, ComponentLink3Description=https://www.verical.com/server-webapp/html/getDatasheet?partID=743571&src-supplier=Verical, ComponentLink3URL=https://www.verical.com/server-webapp/html/getDatasheet?partID=743571&src-supplier=Verical, ComponentLink4Description=http://www.tdk.co.jp/tefe02/e412_c.pdf?src-supplier=Avnet+Europe, ComponentLink4URL=http://www.tdk.co.jp/tefe02/e412_c.pdf?src-supplier=Avnet+Europe, Construction=Flat, Depth=0.5mm, Height=0.5mm, Lead Free="Lead Free", Length=1mm, Manufacturer Part Number=C1005X5R1H104K050BB, Mount="Surface Mount", Packaging="Tape and Reel", Pricing 1="1=0.12, 10=0.09, 50=0.049, 100=0.04, 500=0.02858, 1000=0.02245, 2500=0.02041, 5000=0.01878 (USD)", Radiation Hardening=No, REACH SVHC="No SVHC", Resistor Type=Ceramic, RoHS Compliant=Yes, Series=C, Stock 1=1455182, Supplier 1=Digi-Key, Termination=SMD/SMT, Thickness=0.022inch, Voltage Rating=50V, Voltage Rating (DC)=50V, Weight=2.3E-05oz, Width=0.02inch
C9: library part UCD1A101MCL1GS, "CAP ALUM 100UF 20% 10V SMD", Case/Package=Radial, LCSC Part Number=C340720, Leakage Current=10uA, Manufacturer=Nichicon, Max Operating Temperature=105°C, Min Operating Temperature=-55°C, Package Quantity=1000, Ripple Current=240mA, Supplier Part Number 1=493-14563-1-ND, Tolerance=20%, Voltage=10V, Capacitance=100uF, Category="Aluminum Electrolytic Capacitors", ComponentLink1Description=https://datasheet.ciiva.com/11776/0900766b80ebdadd-11776792.pdf?src-supplier=RSComponents, ComponentLink1URL=https://datasheet.ciiva.com/11776/0900766b80ebdadd-11776792.pdf?src-supplier=RSComponents, ComponentLink2Description=https://datasheet.ciiva.com/111/e-cd-111628.pdf?src-supplier=Digi-Key, ComponentLink2URL=https://datasheet.ciiva.com/111/e-cd-111628.pdf?src-supplier=Digi-Key, ComponentLink3Description=https://datasheet.ciiva.com/11686/e-cd-11686168.pdf?src-supplier=Avnet, ComponentLink3URL=https://datasheet.ciiva.com/11686/e-cd-11686168.pdf?src-supplier=Avnet, Construction=Cylindrical, Diameter=6.3mm, Dissipation Factor=0.19%, Height=5.8mm, Height - Seated (Max)=0.24inch, Impedance=360mR, Item Type=Capacitor, Length=5.8mm, Life (Hours)=2000Hour, Manufacturer Part Number=UCD1A101MCL1GS, Mount="Surface Mount", Packaging="Tape and Reel", Polarity=Polar, Pricing 1="1=0.51000, 10=0.35900, 50=0.27160, 100=0.23660, 500=0.17526 (USD)", Radiation Hardening=No, RoHS=Yes, RoHS Compliant=Yes, Series=CD, Stock 1=6029, Supplier 1=Digi-Key, Termination=SMD/SMT, Voltage Rating=10V, Voltage Rating (DC)=10V
C11 C17 C29 C45 C48: library part CC0603KRX5R7BB106, "CAP CER 10UF 16V X5R 0603", Case Code (Imperial)=0603, Case Code (Metric)=1608, LCSC Part Number=C2936601, Manufacturer=Yageo, Max Operating Temperature=85°C, Min Operating Temperature=-55°C, Supplier Part Number 1=311-3486-1-ND, Tolerance=10%, Voltage Rating=16V, Capacitance=10uF, Case/Package=0603, Category="Ceramic Capacitors", ComponentLink1Description=http://www.yageo.com/documents/recent/UPY-GPHC_X5R_4V-to-50V_25.pdf?src-supplier=Digi-Key, ComponentLink1URL=http://www.yageo.com/documents/recent/UPY-GPHC_X5R_4V-to-50V_25.pdf?src-supplier=Digi-Key, Item Type=Capacitor, Manufacturer Part Number=CC0603KRX5R7BB106, Mount="Surface Mount", Packaging="Cut Tape", Pricing 1="1=0.68000, 10=0.48000, 50=0.36300, 100=0.31610, 500=0.23416, 1000=0.19903 (USD)", RoHS=Yes, RoHS Compliant=Yes, Stock 1=240725, Supplier 1=Digi-Key
C12: library part CC1206KKX7RCBB472, "CAP CER 4700PF 1KV X7R 1206", Case Code (Imperial)=1206, Case Code (Metric)=3216, Dielectric=X7R, Dielectric Material=Ceramic, LCSC Part Number=C107198, Manufacturer=Yageo, Max Operating Temperature=125°C, Min Operating Temperature=-55°C, Supplier Part Number 1=7130131, Tolerance=10%, Voltage Rating=1kV, Capacitance=4.7nF, Case/Package=1206, Category="Ceramic Capacitors", ComponentLink1Description=https://datasheet.ciiva.com/13208/upy-gp-np0-16v-to-50v-8-13208693.pdf?src-supplier=Mouser, ComponentLink1URL=https://datasheet.ciiva.com/13208/upy-gp-np0-16v-to-50v-8-13208693.pdf?src-supplier=Mouser, ComponentLink2Description=https://datasheet.ciiva.com/11466/hv-11466701.pdf?src-supplier=Avnet, ComponentLink2URL=https://datasheet.ciiva.com/11466/hv-11466701.pdf?src-supplier=Avnet, Depth=1.6mm, Item Type=Capacitor, Lead Free="Lead Free", Length=3.2mm, Manufacturer Part Number=CC1206KKX7RCBB472, Mount="Surface Mount", Number of Pins=2, Packaging="Tape and Reel", Pricing 1="3000=0.02860, 9000=0.02750, 15000=0.02700, 45000=0.02600, 75000=0.02510 (USD)", Radiation Hardening=No, Resistor Type=Ceramic, RoHS=Yes, RoHS Compliant=Yes, Series=CC, Stock 1=180000, Supplier 1="Future Electronics", Termination=SMD/SMT, Thickness=0.057inch, Voltage Rating (DC)=1kV, Weight=0.000571oz, Width=0.063inch
C13 C26 C46: library part CL10B104KB8NNNL, "CAP CER 0.1UF 50V X7R 0603", Capacitance=100nF, Case/Package=0603, Dielectric=X7R, LCSC Part Number=C913912, Manufacturer=Samsung, Max Operating Temperature=125°C, Min Operating Temperature=-55°C, Package Quantity=15000, Supplier Part Number 1=1276-CL10B104KB8NNNLCT-ND, Tolerance=10%, Voltage Rating=50V, ComponentLink1Description=https://www.verical.com/server-webapp/html/getDatasheet?partID=357523&src-supplier=Verical, ComponentLink1URL=https://www.verical.com/server-webapp/html/getDatasheet?partID=357523&src-supplier=Verical, ComponentLink2Description=https://media.digikey.com/pdf/Data%20Sheets/Samsung%20PDFs/CL_Series_MLCC_ds.pdf?src-supplier=Digi-Key, ComponentLink2URL=https://media.digikey.com/pdf/Data%20Sheets/Samsung%20PDFs/CL_Series_MLCC_ds.pdf?src-supplier=Digi-Key, Construction=Flat, Depth=0.8mm, Height=0.8mm, Item Type=Capacitor, Length=1.6mm, Manufacturer Part Number=CL10B104KB8NNNL, Mount="Surface Mount", Packaging="Tape and Reel", Pricing 1="1=0.1, 10=0.03, 50=0.0164, 100=0.0134, 500=0.00958, 1000=0.00753, 2500=0.00684, 5000=0.0063 (USD)", Radiation Hardening=No, RoHS Compliant=Yes, Series=CL, Stock 1=3731229, Supplier 1=Digi-Key, Thickness=0.035inch, Voltage Rating (DC)=50V, Width=0.031inch
C14: library part CC0603MRX5R6BB226, "CAP CER 22UF 10V X5R 0603", Case Code (Imperial)=0603, Case Code (Metric)=1608, Dielectric=X5R, LCSC Part Number=C109447, Manufacturer=Yageo, Max Operating Temperature=85°C, Min Operating Temperature=-55°C, Package Quantity=4000, Supplier Part Number 1=311-1819-1-ND, Tolerance=20%, Voltage Rating=10V, Capacitance=22uF, Case/Package=0603, Category="Ceramic Capacitors", ComponentLink1Description=http://www.mouser.com/ds/2/447/Yageo_UPY-GP_NP0_16V-to-50V_9-358835.pdf?src-supplier=Mouser, ComponentLink1URL=http://www.mouser.com/ds/2/447/Yageo_UPY-GP_NP0_16V-to-50V_9-358835.pdf?src-supplier=Mouser, ComponentLink2Description=http://www.yageo.com/documents/recent/UPY-GPHC_X5R_4V-to-50V_25.pdf?src-supplier=Digi-Key, ComponentLink2URL=http://www.yageo.com/documents/recent/UPY-GPHC_X5R_4V-to-50V_25.pdf?src-supplier=Digi-Key, Halogen Free="Halogen Free", Height=0.8mm, Item Type=Capacitor, Lead Free="Lead Free", Length=0.063inch, Manufacturer Part Number=CC0603MRX5R6BB226, Mount="Surface Mount", Packaging="Tape and Reel", Pricing 1="1=0.68000, 10=0.48000, 50=0.36300, 100=0.31610, 500=0.23416, 1000=0.19903 (USD)", RoHS=Yes, RoHS Compliant=Yes, Stock 1=19628, Supplier 1=Digi-Key, Termination=SMD/SMT, Thickness=0.035inch, Voltage Rating (DC)=10V, Weight=7.1E-05oz, Width=0.8mm
C15 C16: library part CC0805MKX5R8BB226, "CAP CER 22UF 25V X5R 0805", Case Code (Imperial)=0805, Case Code (Metric)=2012, Dielectric=X5R, LCSC Part Number=C784585, Manufacturer=Yageo, Max Operating Temperature=85°C, Min Operating Temperature=-55°C, Package Quantity=3000, Supplier Part Number 1=311-1903-1-ND, Tolerance=20%, Voltage Rating=25V, Capacitance=22uF, Case/Package=0805, Category="Ceramic Capacitors", ComponentLink1Description=http://www.mouser.com/ds/2/447/Yageo_UPY-GP_NP0_16V-to-50V_9-358835.pdf?src-supplier=Mouser, ComponentLink1URL=http://www.mouser.com/ds/2/447/Yageo_UPY-GP_NP0_16V-to-50V_9-358835.pdf?src-supplier=Mouser, ComponentLink2Description=http://www.yageo.com/documents/recent/UPY-GPHC_X5R_4V-to-50V_25.pdf?src-supplier=Digi-Key, ComponentLink2URL=http://www.yageo.com/documents/recent/UPY-GPHC_X5R_4V-to-50V_25.pdf?src-supplier=Digi-Key, Halogen Free="Halogen Free", Height=1.25mm, Item Type=Capacitor, Lead Free="Lead Free", Length=0.079inch, Manufacturer Part Number=CC0805MKX5R8BB226, Mount="Surface Mount", Packaging="Tape and Reel", Pricing 1="1=0.47000, 10=0.33300, 50=0.25140, 100=0.21900, 500=0.16222, 1000=0.13789 (USD)", RoHS=Yes, RoHS Compliant=Yes, Stock 1=64970, Supplier 1=Digi-Key, Termination=SMD/SMT, Thickness=0.057inch, Voltage Rating (DC)=25V, Weight=0.000194oz, Width=0.049inch
C22: library part CC0402KRX5R6BB105, "CAP CER 1UF 10V X5R 0402", Case Code (Imperial)=0402, Case Code (Metric)=1005, Dielectric=X5R, LCSC Part Number=C106254, Manufacturer=Yageo, Max Operating Temperature=85°C, Min Operating Temperature=-55°C, Package Quantity=1, Resistor Type=Ceramic, Supplier Part Number 1=603-CC402KRX5R6BB105, Tolerance=10%, Voltage Rating=10V, Capacitance=1uF, Case/Package=0402, Category="Ceramic Capacitors", ComponentLink1Description=https://datasheet.ciiva.com/176/upy-gphc-x5r-4v-to-50v-12-176704.pdf?src-supplier=Digi-Key, ComponentLink1URL=https://datasheet.ciiva.com/176/upy-gphc-x5r-4v-to-50v-12-176704.pdf?src-supplier=Digi-Key, ComponentLink2Description=https://datasheet.ciiva.com/176/mlccorderingcode-176705.pdf?src-supplier=Digi-Key, ComponentLink2URL=https://datasheet.ciiva.com/176/mlccorderingcode-176705.pdf?src-supplier=Digi-Key, ComponentLink3Description=https://datasheet.ciiva.com/176/mlccorderingcode-176706.pdf?src-supplier=Digi-Key, ComponentLink3URL=https://datasheet.ciiva.com/176/mlccorderingcode-176706.pdf?src-supplier=Digi-Key, Construction=Flat, Depth=0.5mm, Dissipation Factor=15%, Halogen Free="Halogen Free", Height=0.5mm, Lead Free="Lead Free", Length=1mm, Manufacturer Part Number=CC0402KRX5R6BB105, Mount="Surface Mount", Number of Pins=2, Packaging="Tape and Reel", Pricing 1="1=0.11000, 10=0.05500, 50=0.05500, 100=0.03300, 500=0.02700, 1000=0.02200, 2500=0.02100, 10000=0.01800 (USD)", Radiation Hardening=No, REACH SVHC="No SVHC", RoHS=Yes, RoHS Compliant=Yes, Series=CC, Stock 1=6711367, Supplier 1=Mouser, Termination=SMD/SMT, Thickness=0.022inch, Voltage Rating (DC)=10V, Width=0.02inch
C23: library part VKMD1451K101MV, "100uF 80V 735mA@100kHz ±20% SMD,D8xL14.5mm Aluminum Electrolytic Capacitors - SMD ROHS", LCSC Part Number=C487409, Manufacturer=Ymin, Package=SMD,D8xL14.5mm, ComponentLink1Description=LCSC, ComponentLink1URL=https://www.lcsc.com/product-detail/Aluminum-Electrolytic-Capacitors-SMD_Ymin-VKMD1451K101MV_C487409.html, Item Type=Capacitor, Manufacturer Part Number=VKMD1451K101MV
C24: library part CL05A105KA5NQNC, "CAP CER 1UF 25V X5R 0402", Case Code (Imperial)=0402, Case Code (Metric)=1005, Dielectric=X5R, LCSC Part Number=C52923, Manufacturer=Samsung, Max Operating Temperature=85°C, Min Operating Temperature=-55°C, Package Quantity=10000, Tolerance=10%, Voltage Rating=25V, Case/Package=0402, Category="Ceramic Capacitors", ComponentLink1Description=https://datasheet.ciiva.com/25720/cl05a105ka5nqnc-25720771.pdf?src-supplier=Digi-Key, ComponentLink1URL=https://datasheet.ciiva.com/25720/cl05a105ka5nqnc-25720771.pdf?src-supplier=Digi-Key, ComponentLink2Description=https://datasheet.ciiva.com/3777/cl05a105ka5nqnc-3777709.pdf?src-supplier=Arrow+Electronics, ComponentLink2URL=https://datasheet.ciiva.com/3777/cl05a105ka5nqnc-3777709.pdf?src-supplier=Arrow+Electronics, ComponentLink3Description=https://datasheet.ciiva.com/29198/459147-da-01-en-vs-kondensator-0402-29198339.pdf?src-supplier=Conrad, ComponentLink3URL=https://datasheet.ciiva.com/29198/459147-da-01-en-vs-kondensator-0402-29198339.pdf?src-supplier=Conrad, Construction=Flat, Depth=0.5mm, Height=0.5mm, Item Type=Capacitor, Lead Free="Lead Free", Length=1mm, Manufacturer Part Number=CL05A105KA5NQNC, Material=Ceramic, Mounting Technology="Surface Mount", Packaging="Tape and Reel", Pricing 1="10000=0.0256, 20000=0.0238, 30000=0.0228, 50000=0.0207, 100000=0.0175, 250000=0.0157 (USD)", Radiation Hardening=No, RoHS=Yes, RoHS Compliant=Yes, Series=CL, Stock 1=80000, Supplier 1="Arrow Electronics", Supplier Part Number 1=CL05A105KA5NQNC, Thickness=0.022inch, Width=0.02inch
C27: library part CC0402KRX5R8BB105, "CAP CER 1UF 25V X5R 0402", Case Code (Imperial)=0402, Case Code (Metric)=1005, Dielectric=X5R, LCSC Part Number=C326568, Manufacturer=Yageo, Max Operating Temperature=85°C, Min Operating Temperature=-55°C, Package Quantity=10000, Supplier Part Number 1=603-CC402KRX5R8BB105, Tolerance=10%, Voltage Rating=25V, Capacitance=1uF, Case/Package=0402, Category="Ceramic Capacitors", ComponentLink1Description=http://www.mouser.com/ds/2/447/Yageo_UPY-GP_NP0_16V-to-50V_9-358835.pdf?src-supplier=Mouser, ComponentLink1URL=http://www.mouser.com/ds/2/447/Yageo_UPY-GP_NP0_16V-to-50V_9-358835.pdf?src-supplier=Mouser, ComponentLink2Description=http://www.yageo.com/documents/recent/UPY-GPHC_X5R_4V-to-50V_25.pdf?src-supplier=Digi-Key, ComponentLink2URL=http://www.yageo.com/documents/recent/UPY-GPHC_X5R_4V-to-50V_25.pdf?src-supplier=Digi-Key, ComponentLink3Description=https://4donline.ihs.com/images/VipMasterIC/IC/YAGO/YAGO-S-A0006851646/YAGO-S-A0006851646-1.pdf?hkey=6D3A4C79FDBF58556ACFDE234799DDF0&src-supplier=Newark, ComponentLink3URL=https://4donline.ihs.com/images/VipMasterIC/IC/YAGO/YAGO-S-A0006851646/YAGO-S-A0006851646-1.pdf?hkey=6D3A4C79FDBF58556ACFDE234799DDF0&src-supplier=Newark, Halogen Free="Halogen Free", Lead Free="Lead Free", Length=0.039inch, Manufacturer Part Number=CC0402KRX5R8BB105, Mount="Surface Mount", Packaging="Tape and Reel", Pricing 1="1=0.30000, 10=0.20400, 50=0.20400, 100=0.11600, 1000=0.07200, 10000=0.05900 (USD)", RoHS=Yes, RoHS Compliant=Yes, Stock 1=91975, Supplier 1=Mouser, Termination=SMD/SMT, Thickness=0.022inch, Voltage Rating (DC)=25V, Weight=2.3E-05oz, Width=0.02inch
C31 C32: library part 0603B682K500NT, "50V 6.8nF X7R ±10% 0603", LCSC Part Number=C1631, Manufacturer=FH, ComponentLink1Description=LCSC, ComponentLink1URL=https://www.lcsc.com/product-detail/Multilayer-Ceramic-Capacitors-MLCC-SMD-SMT_FH-Guangdong-Fenghua-Advanced-Tech-0603B682K500NT_C1631.html, Item Type=Capacitor, Manufacturer Part Number=0603B682K500NT
C33 C54: library part CC0603JRNPO9BN103, "CAP CER 10000PF 50V C0G/NPO 0603", Case/Package=0603, LCSC Part Number=C389113, Manufacturer=Yageo, Max Operating Temperature=125°C, Min Operating Temperature=-55°C, Tolerance=5%, Voltage Rating=50V, Capacitance=10nF, Category="Ceramic Capacitors", ComponentLink1Description=http://www.yageo.com/documents/recent/UPY-GP_NP0_16V-to-50V_16.pdf?src-supplier=Digi-Key, ComponentLink1URL=http://www.yageo.com/documents/recent/UPY-GP_NP0_16V-to-50V_16.pdf?src-supplier=Digi-Key, ComponentLink2Description=http://www.yageo.com/exep/pages/download/literatures/ProductSelectionGuide%202014_Final_2.pdf?src-supplier=Digi-Key, ComponentLink2URL=http://www.yageo.com/exep/pages/download/literatures/ProductSelectionGuide%202014_Final_2.pdf?src-supplier=Digi-Key, Item Type=Capacitor, Length=0.063inch, Manufacturer Part Number=CC0603JRNPO9BN103, Mount="Surface Mount", Packaging="Tape and Reel", Pricing 1="1=0.42340, 10=0.29770, 25=0.25590, 100=0.19550, 250=0.19360, 500=0.14320, 1000=0.12060, 3000=0.11930 (USD)", RoHS=Yes, RoHS Compliant=Yes, Stock 1=5425, Supplier 1="Arrow Electronics", Supplier Part Number 1=CC0603JRNPO9BN103, Thickness=0.035inch, Width=0.031inch
C34: library part CC0603KRX7R9BB223, "CAP CER 0.022UF 50V X7R 0603", Case Code (Imperial)=0603, Case Code (Metric)=1608, Dielectric=X7R, Dielectric Material=Ceramic, Insulation Resistance=100GR, LCSC Part Number=C106222, Manufacturer=Yageo, Max Operating Temperature=125°C, Min Operating Temperature=-55°C, Package Quantity=1, Supplier Part Number 1=311-1370-1-ND, Tolerance=10%, Voltage=50V, Capacitance=22nF, Case/Package=0603, Category="Ceramic Capacitors", ComponentLink1Description=https://datasheet.ciiva.com/8033/70765-8033869.pdf?src-supplier=Element14, ComponentLink1URL=https://datasheet.ciiva.com/8033/70765-8033869.pdf?src-supplier=Element14, ComponentLink2Description=https://datasheet.ciiva.com/28450/1489800-28450639.pdf?src-supplier=Element14, ComponentLink2URL=https://datasheet.ciiva.com/28450/1489800-28450639.pdf?src-supplier=Element14, ComponentLink3Description=https://datasheet.ciiva.com/8033/1489800-8033867.pdf?src-supplier=Element14, ComponentLink3URL=https://datasheet.ciiva.com/8033/1489800-8033867.pdf?src-supplier=Element14, ComponentLink4Description=https://datasheet.ciiva.com/8033/1489800-8033865.pdf?src-supplier=Element14, ComponentLink4URL=https://datasheet.ciiva.com/8033/1489800-8033865.pdf?src-supplier=Element14, ComponentLink5Description=https://datasheet.ciiva.com/156/mlccorderingcode-156178.pdf?src-supplier=Digi-Key, ComponentLink5URL=https://datasheet.ciiva.com/156/mlccorderingcode-156178.pdf?src-supplier=Digi-Key, ComponentLink6Description=https://datasheet.ciiva.com/156/mlccorderingcode-156177.pdf?src-supplier=Digi-Key, ComponentLink6URL=https://datasheet.ciiva.com/156/mlccorderingcode-156177.pdf?src-supplier=Digi-Key, ComponentLink7Description=https://datasheet.ciiva.com/156/mlccorderingcode-156179.pdf?src-supplier=Digi-Key, ComponentLink7URL=https://datasheet.ciiva.com/156/mlccorderingcode-156179.pdf?src-supplier=Digi-Key, ComponentLink8Description=https://datasheet.ciiva.com/11464/upy-gphc-x7r-6-3v-to-50v-8-11464741.pdf?src-supplier=Avnet, ComponentLink8URL=https://datasheet.ciiva.com/11464/upy-gphc-x7r-6-3v-to-50v-8-11464741.pdf?src-supplier=Avnet, Depth=0.8mm, Halogen Free="Halogen Free", Height=0.8mm, Item Type=Capacitor, Lead Free="Lead Free", Length=1.6mm, Manufacturer Part Number=CC0603KRX7R9BB223, Mount="Surface Mount", Number of Pins=2, Packaging="Tape and Reel", Pricing 1="1=0.10000, 10=0.05500, 50=0.03020, 100=0.02460, 500=0.01760, 1000=0.01383 (USD)", Radiation Hardening=No, REACH SVHC="No SVHC", Resistor Type=Ceramic, RoHS=Yes, RoHS Compliant=Yes, Series=CC, Stock 1=119735, Supplier 1=Digi-Key, Termination=SMD/SMT, Thickness=0.035inch, Voltage Rating=50V, Voltage Rating (DC)=50V, Width=0.031inch
C35 C44: library part CC0402KRX5R6BB475, "CAP CER 4.7UF 10V X5R 0402", Case Code (Imperial)=0402, Case Code (Metric)=1005, LCSC Part Number=C326586, Manufacturer=Yageo, Max Operating Temperature=85°C, Min Operating Temperature=-55°C, Supplier Part Number 1=3871698, Tolerance=10%, Voltage Rating=10V, Capacitance=4.7uF, Case/Package=0402, Category="Ceramic Capacitors", ComponentLink1Description=http://www.yageo.com/documents/recent/UPY-GPHC_X5R_4V-to-50V_25.pdf?src-supplier=Digi-Key, ComponentLink1URL=http://www.yageo.com/documents/recent/UPY-GPHC_X5R_4V-to-50V_25.pdf?src-supplier=Digi-Key, Manufacturer Part Number=CC0402KRX5R6BB475, Mount="Surface Mount", Packaging="Cut Tape", Pricing 1="10000=0.02310, 50000=0.02100 (GBP)", RoHS=Yes, RoHS Compliant=Yes, Stock 1=20000, Supplier 1=Farnell